# Altium PCB PCB1.pcbdoc (part 2 of 2)
Units mil, origin at the board's own origin, x right, y up, seen from the top; angles counter-clockwise.
Board outline 2165.35 x 3346.46 mil, 4 copper layers (Top Layer, Inner1, Inner2, Bottom Layer), stack 62.447 mil thick; 78 components, 74 nets, 396 pads, 501 vias.
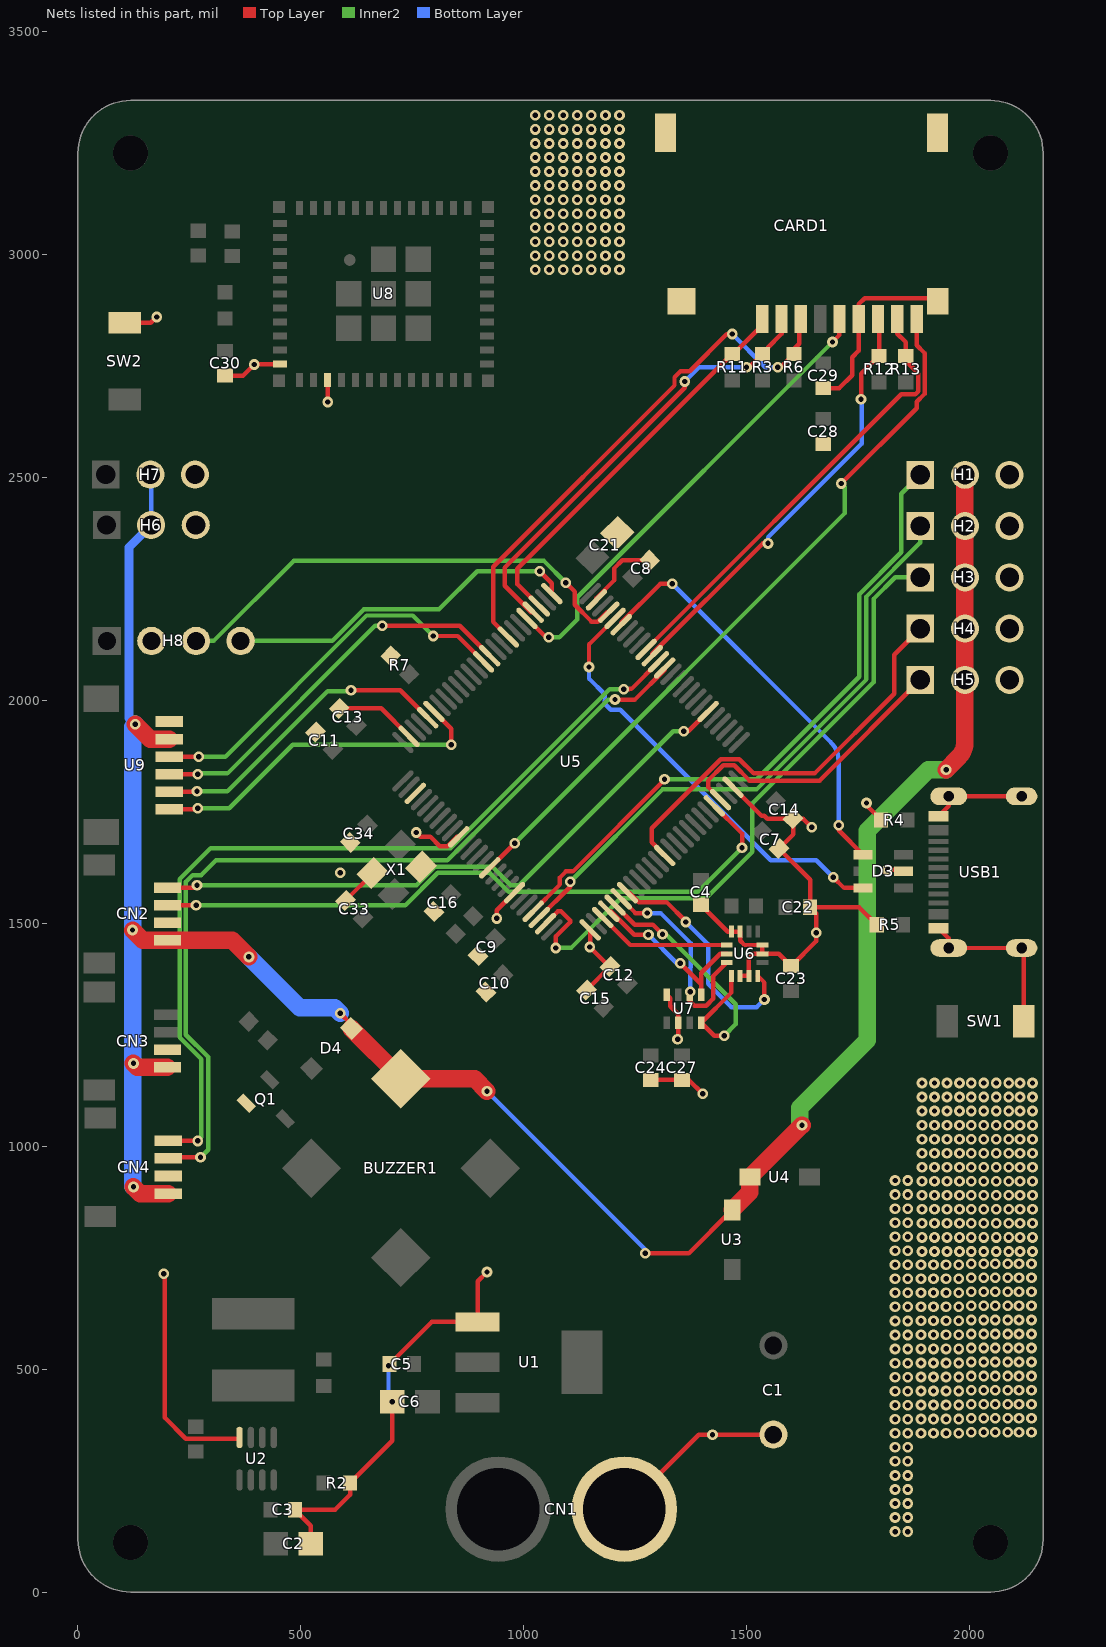
[diagram p4: the nets of this part, all layers, seen from the top]

## Via types
v1: diameter 24.02, hole 12, Top Layer to Bottom Layer, 501 vias

## Nets (pads, with @x,y where several pads share a name; then routed paths per layer and width w, separated by ;. In a path a pad name is that pad's centre, name@x,y a point inside that pad or via, vN(x,y) a via of type N, cw(c..) or ccw(c..) an arc to the next point about the centre after c; other vN are vias at no path point) (continued)
GND: C1.2 C2.1 C3.1 C4.1 C5.2 C6.1 C7.1 C8.1 C9.1 C10.2 C11.2 C12.1 C13.1 C14.2 C15.1 C16.1 C21.1 C22.1 C23.1 C24.1 C27.1 C28.1 C29.1 C30.2 C33.1 C34.2 CARD1.6 CARD1.10 CARD1.11 CARD1.12 CARD1.13 CN1.2 CN2.3 CN3.3 CN4.3 D3.2 H1.3 H2.3 H3.3 H4.3 H5.3 H6.3 H7.3 H8.2 Q1.2 R2.2 R4.1 R5.1 R7.2 SW1.2 SW2.1 U1.1 U2.4 U5.10 U5.19 U5.26 U5.49 U5.74 U5.99 U6.2 U6.3 U6.6 U6.7 U6.10 U6.11 U7.1 U7.7 U8.11 U8.14 U9.1 USB1.1 USB1.2 USB1.3 USB1.4 USB1.A1B12 USB1.B1A12 X1.2 X1.4 | length 5429.1
  Top Layer w10: SW2.1@105,2847.48 163.62,2847.48 v1(176.69,2860.55) ; v1(192.76,714.13) 194.76,712.13 194.76,391.38 242.01,344.13 359.74,344.13 U2.4@362.42,346.81 ; C30.2@330,2728.9 370.31,2728.9 v1(395.55,2754.13) 452.27,2754.13 U8.11@453.25,2755.11 ; C2.1@522.5,108.38 522.5,148.78 C3.1@486.6,184.68 576.89,184.68 610.39,218.19 610.39,243.83 R2.2@609.94,244.29 705.19,339.54 v1(705.19,427.01) ; U8.14@559.55,2719.68 560.2,2719.03 v1(560.2,2669.8) ; C13.1@586.26,1982.59 680.11,1982.59 U5.99@742.85,1919.85 ; C33.1@600.4,1551.26 661.06,1611.92 X1.2@661.06,1613.2 ; v1(696.73,507.32) 696.73,509.14 C5.2@698.93,511.34 793.49,605.9 U1.1@896.68,605.9 896.68,697.23 v1(917.6,718.15) ; v1(758.98,1703.92) 767.95,1694.94 790.14,1694.94 811.78,1673.3 829.19,1673.3 850.26,1694.37 U5.10@854.2,1694.37 ; v1(939.68,1511.26) 939.68,1529.3 U5.19@979.48,1569.09 ; C15.1@1140.73,1350.34 C12.1@1193.76,1403.37 1192.14,1403.37 v1(1148.5,1447.01) 1149.29,1447.8 U5.26@1149.29,1485.58 ; U5.74@1163.21,2226.09 1163.21,2230.03 1202.72,2269.54 1202.72,2296.34 1221.31,2314.93 C8.1@1282.84,2314.93 ; CN1.2@1225.98,186.06 1393.03,353.11 C1.2@1560.12,353.11 ; C24.1@1285,1148.9 C27.1@1355,1148.9 1370.32,1148.9 v1(1401.5,1117.72) ; U7.1@1321.11,1340.33 1328.83,1332.61 1328.83,1313.91 1346.71,1296.03 U7.7@1346.71,1277.33 1346.71,1241.63 v1(1345.28,1240.2) ; C4.1@1397.48,1541.93 1457.82,1481.59 U6.11@1466.04,1481.59 U6.10@1485.73,1481.59 1485.73,1461.16 1495.3,1451.59 U6.7@1535.43,1451.59 U6.6@1535.43,1431.9 ; U5.49@1469.44,1805.73 1533.7,1741.47 1539.72,1741.47 1546.17,1735.02 C14.2@1604.58,1735.02 ; U6.2@1485.73,1382.22 U6.3@1505.41,1382.22 1505.41,1422.42 1514.89,1431.9 U6.6@1535.43,1431.9 ; v1(1646.05,1715.81) 1626.84,1735.02 C14.2@1604.58,1735.02 ; C29.1@1672.24,2701.09 1707.86,2701.09 1736.81,2730.04 1736.81,2770.2 1751.87,2785.25 1751.87,2856.27 CARD1.6@1751.76,2856.38 1751.76,2889.55 1764.92,2902.72 1921.93,2902.72 CARD1.10@1928.9,2895.75 ; v1(1768.94,1770.28) 1768.94,1764.97 R4.1@1801.91,1731.99 ; R5.1@1791.91,1496.99 1752.45,1536.46 C22.1@1642.56,1536.46 ; v1(1816.41,1620.08) 1848.72,1620.08 D3.2@1851.81,1616.99 ; USB1.A1B12@1930.95,1489.02 1953.59,1466.38 USB1.1@1953.59,1444.93 USB1.3@2116.97,1444.93 2122,1439.9 SW1.2@2122,1280.35 ; USB1.B1A12@1930.95,1740.99 1953.59,1763.63 USB1.2@1953.59,1785.09 USB1.4@2116.97,1785.09 ; U6.6@1535.43,1431.9 1572.12,1431.9 C23.1@1600,1404.02 1656.5,1460.51 v1(1656.5,1479.13) 1656.5,1522.52 C22.1@1642.56,1536.46 ; C14.2@1604.58,1735.02 1604.58,1699.67 C7.1@1572.76,1667.85 1642.56,1598.04 C22.1@1642.56,1536.46
  Bottom Layer w10: v1(696.73,507.32) 696.73,435.46 v1(705.19,427.01)
  other v1: 1833.19,135.63 1861.3,135.63 1833.19,167.13 1861.3,167.13 1833.19,198.62 1861.3,198.62 1833.19,230.12 1861.3,230.12 1833.19,261.61 1861.3,261.61 1833.19,293.11 1861.3,293.11 1833.19,324.61 1861.3,324.61 1423.58,352.72 1833.19,356.1 1861.3,356.1 1891.42,356.5 1919.53,356.5 1947.64,356.5 1975.75,356.5 2003.86,358.5 2031.97,358.5 2058.07,358.5 2086.18,358.5 2111.28,358.5 2139.39,358.5 1833.19,387.6 1861.3,387.6 1891.42,387.99 1919.53,387.99 1947.64,387.99 1975.75,387.99 2003.86,390 2031.97,390 2058.07,390 2086.18,390 2111.28,390 2139.39,390 1833.19,419.09 1861.3,419.09 1891.42,419.49 1919.53,419.49 1947.64,419.49 1975.75,419.49 2003.86,421.5 2031.97,421.5 2058.07,421.5 2086.18,421.5 2111.28,421.5 2139.39,421.5 1833.19,450.59 1861.3,450.59 1891.42,450.98 1919.53,450.98 1947.64,450.98 1975.75,450.98 2003.86,452.99 2031.97,452.99 2058.07,452.99 2086.18,452.99 2111.28,452.99 2139.39,452.99 1833.19,482.09 1861.3,482.09 1891.42,482.48 1919.53,482.48 1947.64,482.48 1975.75,482.48 2003.86,484.49 2031.97,484.49 2058.07,484.49 2086.18,484.49 2111.28,484.49 2139.39,484.49 1833.19,513.58 1861.3,513.58 1891.42,513.98 1919.53,513.98 1947.64,513.98 1975.75,513.98 2003.86,515.98 2031.97,515.98 2058.07,515.98 2086.18,515.98 2111.28,515.98 2139.39,515.98 1833.19,545.24 1861.3,545.24 1891.42,545.47 1919.53,545.47 1947.64,545.47 1975.75,545.47 2003.86,547.48 2031.97,547.48 2058.07,547.48 2086.18,547.48 2111.28,547.48 2139.39,547.48 1833.19,576.73 1861.3,576.73 1891.42,576.97 1919.53,576.97 1947.64,576.97 1975.75,576.97 2003.86,578.98 2031.97,578.98 2058.07,578.98 2086.18,578.98 2111.28,578.98 2139.39,578.98 1833.19,608.23 1861.3,608.23 1891.42,608.46 1919.53,608.46 1947.64,608.46 1975.75,608.46 2003.86,610.47 2031.97,610.47 2058.07,610.47 2086.18,610.47 2111.28,610.47 2139.39,610.47 1833.19,639.72 1861.3,639.72 1891.42,639.96 1919.53,639.96 1947.64,639.96 1975.75,639.96 2003.86,641.97 2031.97,641.97 2058.07,641.97 2086.18,641.97 2111.28,641.97 2139.39,641.97 1833.19,671.22 1861.3,671.22 1891.42,671.46 1919.53,671.46 1947.64,671.46 1975.75,671.46 2003.86,673.46 2031.97,673.46 2058.07,673.46 2086.18,673.46 2111.28,673.46 2139.39,673.46 1833.19,702.72 1861.3,702.72 1891.42,702.95 1919.53,702.95 1947.64,702.95 1975.75,702.95 2003.86,704.96 2031.97,704.96 2058.07,704.96 2086.18,704.96 2111.28,704.96 2139.39,704.96 1833.19,734.21 1861.3,734.21 1891.42,734.45 1919.53,734.45 1947.64,734.45 1975.75,734.45 2003.86,736.46 2031.97,736.46 2058.07,736.46 2086.18,736.46 2111.28,736.46 2139.39,736.46 1893.43,764.09 1921.54,764.09 1949.65,764.09 1977.76,764.09 2003.86,764.09 2031.97,764.09 2060.08,764.09 2088.19,764.09 2113.29,764.09 2141.4,764.09 1833.19,765.71 1861.3,765.71 1893.43,795.59 1921.54,795.59 1949.65,795.59 1977.76,795.59 2003.86,795.59 2031.97,795.59 2060.08,795.59 2088.19,795.59 2113.29,795.59 2141.4,795.59 1833.19,797.2 1861.3,797.2 1893.43,827.09 1921.54,827.09 1949.65,827.09 1977.76,827.09 2003.86,827.09 2031.97,827.09 2060.08,827.09 2088.19,827.09 2113.29,827.09 2141.4,827.09 1833.19,828.7 1861.3,828.7 1893.43,858.58 1921.54,858.58 1949.65,858.58 1977.76,858.58 2003.86,858.58 2031.97,858.58 2060.08,858.58 2088.19,858.58 2113.29,858.58 2141.4,858.58 1833.19,860.2 1861.3,860.2 1893.43,890.08 1921.54,890.08 1949.65,890.08 1977.76,890.08 2003.86,890.08 2031.97,890.08 2060.08,890.08 2088.19,890.08 2113.29,890.08 2141.4,890.08 1833.19,891.69 1861.3,891.69 1893.43,921.57 1921.54,921.57 1949.65,921.57 1977.76,921.57 2003.86,921.57 2031.97,921.57 2060.08,921.57 2088.19,921.57 2113.29,921.57 2141.4,921.57 1833.19,923.19 1861.3,923.19 1893.43,953.07 1921.54,953.07 1949.65,953.07 1977.76,953.07 2003.86,953.07 2031.97,953.07 2060.08,953.07 2088.19,953.07 2113.29,953.07 2141.4,953.07 1893.43,984.57 1921.54,984.57 1949.65,984.57 1977.76,984.57 2003.86,984.57 2031.97,984.57 2060.08,984.57 2088.19,984.57 2113.29,984.57 2141.4,984.57 1893.43,1016.06 1921.54,1016.06 1949.65,1016.06 1977.76,1016.06 2003.86,1016.06 2031.97,1016.06 2060.08,1016.06 2088.19,1016.06 2113.29,1016.06 2141.4,1016.06 1893.43,1047.56 1921.54,1047.56 1949.65,1047.56 1977.76,1047.56 2003.86,1047.56 2031.97,1047.56 2060.08,1047.56 2088.19,1047.56 2113.29,1047.56 2141.4,1047.56 1893.43,1079.06 1921.54,1079.06 1949.65,1079.06 1977.76,1079.06 2003.86,1079.06 2031.97,1079.06 2060.08,1079.06 2088.19,1079.06 2113.29,1079.06 2141.4,1079.06 1893.43,1110.55 1921.54,1110.55 1949.65,1110.55 1977.76,1110.55 2003.86,1110.55 2031.97,1110.55 2060.08,1110.55 2088.19,1110.55 2113.29,1110.55 2141.4,1110.55 1893.43,1142.05 1921.54,1142.05 1949.65,1142.05 1977.76,1142.05 2003.86,1142.05 2031.97,1142.05 2060.08,1142.05 2088.19,1142.05 2113.29,1142.05 2141.4,1142.05 588.31,1613.66 1025.91,2966.42 1057.4,2966.42 1088.9,2966.42 1120.39,2966.42 1151.89,2966.42 1183.39,2966.42 1214.88,2966.42 1025.91,2997.91 1057.4,2997.91 1088.9,2997.91 1120.39,2997.91 1151.89,2997.91 1183.39,2997.91 1214.88,2997.91 1025.91,3029.41 1057.4,3029.41 1088.9,3029.41 1120.39,3029.41 1151.89,3029.41 1183.39,3029.41 1214.88,3029.41 1025.91,3060.91 1057.4,3060.91 1088.9,3060.91 1120.39,3060.91 1151.89,3060.91 1183.39,3060.91 1214.88,3060.91 1025.91,3092.4 1057.4,3092.4 1088.9,3092.4 1120.39,3092.4 1151.89,3092.4 1183.39,3092.4 1214.88,3092.4 1025.91,3123.9 1057.4,3123.9 1088.9,3123.9 1120.39,3123.9 1151.89,3123.9 1183.39,3123.9 1214.88,3123.9 1025.91,3155.39 1057.4,3155.39 1088.9,3155.39 1120.39,3155.39 1151.89,3155.39 1183.39,3155.39 1214.88,3155.39 1025.91,3186.89 1057.4,3186.89 1088.9,3186.89 1120.39,3186.89 1151.89,3186.89 1183.39,3186.89 1214.88,3186.89 1025.91,3218.39 1057.4,3218.39 1088.9,3218.39 1120.39,3218.39 1151.89,3218.39 1183.39,3218.39 1214.88,3218.39 1025.91,3249.88 1057.4,3249.88 1088.9,3249.88 1120.39,3249.88 1151.89,3249.88 1183.39,3249.88 1214.88,3249.88 1025.91,3281.38 1057.4,3281.38 1088.9,3281.38 1120.39,3281.38 1151.89,3281.38 1183.39,3281.38 1214.88,3281.38 1025.91,3312.87 1057.4,3312.87 1088.9,3312.87 1120.39,3312.87 1151.89,3312.87 1183.39,3312.87 1214.88,3312.87
i2c_scl: U5.95 U9.6 | length 783.2
  Top Layer w10: U9.6@204.78,1756.17 267,1756.17 v1(269.06,1758.23) ; U5.95@798.53,1975.53 837.28,1936.77 v1(837.28,1900.79)
  Inner2 w10: v1(269.06,1758.23) 339.33,1758.23 481.89,1900.79 v1(837.28,1900.79)
I2C_SCL: 
i2c_sda: U5.96 U9.5 | length 699.7
  Top Layer w10: U9.5@204.78,1795.54 266.21,1795.54 v1(267.05,1796.38) ; v1(612.4,2023.27) 722.96,2023.27 U5.96@784.61,1961.61
  Inner2 w10: v1(267.05,1796.38) 335.32,1796.38 560.2,2021.26 610.39,2021.26 v1(612.4,2023.27)
I2C_SDA: 
IMU_CS: U5.28 U6.12 | length 304.2
  Top Layer w10: U5.28@1177.13,1513.42 1238.96,1451.59 U6.12@1455.71,1451.59
IMU_INT: U5.32 U6.4 | length 532.4
  Top Layer w10: U5.32@1232.81,1569.09 1236.76,1569.09 1257.82,1548.02 1320.56,1548.02 1363.35,1505.24 v1(1363.35,1503.23) ; U6.4@1525.1,1382.22 1540.04,1367.28 v1(1540.04,1329.45)
  Bottom Layer w10: v1(1363.35,1503.23) 1413.54,1453.03 1413.54,1364.69 1465.75,1312.48 1523.07,1312.48 v1(1540.04,1329.45)
LED: U5.3
PA11: D3.4 U5.70 | length 937.3
  Top Layer w10: U5.70@1218.89,2170.41 1218.89,2174.36 1306.74,2262.2 v1(1333.23,2262.2) ; v1(1706.69,1720.08) 1706.69,1709.03 D3.4@1761.33,1654.39
  Bottom Layer w10: v1(1333.23,2262.2) 1689.4,1906.04 cw(c1647.64,1864.28) 1706.69,1864.28 v1(1706.69,1720.08)
PA12: D3.6 U5.71 | length 981
  Top Layer w10: v1(1146.5,2075.47) 1146.5,2125.85 U5.71@1204.97,2184.33 ; v1(1694.68,1603.65) 1718.74,1579.59 D3.6@1761.33,1579.59
  Bottom Layer w10: v1(1146.5,2075.47) 1146.5,2049.37 1181.93,2013.94 1181.93,1992.76 1195.4,1979.29 1216.57,1979.29 1554.09,1641.77 1656.56,1641.77 v1(1694.68,1603.65)
PC0: CARD1.9 U5.15 | length 1649.3
  Top Layer w10: U5.15@923.8,1624.77 924.69,1624.77 v1(979.84,1679.92) ; v1(1712.72,2487.09) 1881.65,2656.02 1881.65,2670.15 1899.25,2687.76 1899.25,2779.72 1881.65,2797.32 CARD1.9@1881.65,2856.38
  Inner2 w10: v1(979.84,1679.92) 1719.79,2419.87 1719.79,2480.02 v1(1712.72,2487.09)
PC8: CARD1.7 R12.2 U5.65 | length 975
  Top Layer w10: U5.65@1288.49,2100.81 1288.49,2104.77 1536.28,2352.56 v1(1548.07,2352.56) ; v1(1756.89,2675.83) 1756.89,2732.95 R12.2@1797.24,2773.31 1797.24,2854.17 CARD1.7@1795.04,2856.38
  Bottom Layer w10: v1(1548.07,2352.56) 1548.07,2366.61 1757.94,2576.48 1757.94,2674.78 v1(1756.89,2675.83)
PC9: CARD1.8 R13.2 U5.66 | length 1032.7
  Top Layer w10: U5.66@1274.56,2114.73 1846.96,2687.13 1878.8,2687.13 1885.24,2693.56 1885.24,2734.41 1857.24,2762.4 R13.2@1857.24,2773.31 1857.24,2804.37 1838.35,2823.27 CARD1.8@1838.35,2856.38
PC10: CARD1.1 R11.2 U5.78 | length 894.3
  Top Layer w10: U5.78@1035.16,2212.16 985.87,2261.46 985.87,2295.88 R11.2@1467.76,2777.77 1471.31,2777.77 1535.24,2841.69 CARD1.1@1535.24,2856.38
PC11: CARD1.2 R3.2 U5.79 | length 1004.8
  Top Layer w10: U5.79@1021.24,2198.25 1017.28,2198.25 957.76,2257.78 957.76,2298.35 1361.34,2701.93 v1(1361.34,2715.98) ; v1(1499.88,2748.11) 1506.36,2748.11 R3.2@1536.02,2777.77 ; R3.2@1547.24,2778.31 1547.24,2791.46 1578.53,2822.74 CARD1.2@1578.53,2856.38
  Bottom Layer w10: v1(1361.34,2715.98) 1393.46,2748.11 v1(1499.88,2748.11)
PC12: CARD1.5 U5.80 | length 1065.4
  Top Layer w10: U5.80@1007.32,2184.33 1049.91,2141.73 v1(1056.14,2141.73) ; v1(1692.64,2804.33) 1708.44,2820.13 CARD1.5@1708.44,2856.38
  Inner2 w10: v1(1056.14,2141.73) 1080.24,2141.73 1120.39,2181.89 1120.39,2232.09 v1(1692.64,2804.33)
PD2: CARD1.3 R6.2 U5.83 | length 1201.6
  Top Layer w10: U5.83@965.57,2142.57 931.65,2176.48 931.65,2300.35 1338.35,2707.05 1338.35,2725.51 1351.81,2738.98 1372.28,2738.98 1455.71,2822.4 v1(1467.76,2822.4) ; v1(1570.16,2748.11) 1576.64,2748.11 R6.2@1606.3,2777.77 1607.24,2778.72 1607.24,2789.21 1618.35,2800.31 1618.35,2852.91 CARD1.3@1621.82,2856.38
  Bottom Layer w10: v1(1467.76,2822.4) 1542.05,2748.11 v1(1570.16,2748.11)
SERVO1: H1.1 U5.22 | length 1469.5
  Top Layer w10: U5.22@1021.24,1527.33 1081.34,1587.43 1081.34,1603.11 1094.81,1616.57 1110.49,1616.57 1315.97,1822.05 v1(1315.97,1823.68)
  Inner2 w10: v1(1315.97,1823.68) 1523.17,1823.68 1752.87,2053.39 1752.87,2238.11 1847.24,2332.48 1847.24,2463.7 H1.1@1890,2506.46
SERVO2: H2.1 U5.23 | length 1355.6
  Top Layer w10: U5.23@1035.16,1513.42 1104.33,1582.59 v1(1104.33,1593.58)
  Inner2 w10: v1(1104.33,1593.58) 1311.44,1800.69 1522.26,1800.69 1768.94,2047.36 1768.94,2233.42 1890,2354.49 H2.1@1890,2391.46
SERVO3: H3.1 U5.24 | length 1485.7
  Top Layer w10: U5.24@1049.08,1499.49 1076.91,1527.32 1083.66,1527.32 1104.43,1506.55 1104.43,1503.13 1072.2,1470.9 v1(1072.2,1445)
  Inner2 w10: v1(1072.2,1445) 1106.34,1445 1217.91,1556.57 1409.05,1556.57 1512.83,1660.36 1512.83,1769.17 1785,2041.34 1785,2228.07 1833.39,2276.46 H3.1@1890,2276.46
SERVO4: H4.1 U5.38 | length 939.5
  Top Layer w10: U5.38@1316.33,1652.61 1287.05,1681.89 1287.05,1713.8 1441.89,1868.64 1483.84,1868.64 1515.94,1836.54 1652.48,1836.54 1831.18,2015.24 1831.18,2102.64 H4.1@1890,2161.46
SERVO5: H5.1 U5.47 | length 652.6
  Top Layer w10: U5.47@1441.6,1777.89 1413.54,1805.95 1413.54,1820.47 1447.7,1854.63 1472.26,1854.63 1506.41,1820.47 1664.02,1820.47 H5.1@1890,2046.46
SPI_MISO: U5.30 U6.1 U7.5 | length 641.1
  Top Layer w10: U5.30@1204.97,1541.25 1249.02,1497.2 1269.94,1497.2 1270.31,1497.57 1289.35,1497.57 v1(1311.47,1475.45) ; v1(1449.69,1248.23) 1427.41,1248.23 U7.5@1398.31,1277.33 1466.04,1345.06 U6.1@1466.04,1382.22
  Inner2 w10: v1(1311.47,1475.45) 1319.23,1475.45 1475.79,1318.89 1475.79,1274.33 v1(1449.69,1248.23)
SPI_MOSI: U5.31 U6.14 U7.3 | length 478.2
  Top Layer w10: U5.31@1218.89,1555.17 1250.75,1523.31 v1(1277.01,1523.31) ; U7.3@1372.71,1340.33 1372.71,1325.2 1382.35,1315.56 1409.76,1315.56 1425.59,1331.4 1425.59,1382.09 U6.14@1455.71,1412.22
  Bottom Layer w10: v1(1277.01,1523.31) 1307.13,1523.31 1374.29,1456.14 1374.29,1401.34 1373.39,1400.44 v1(1373.39,1346.61)
SPI_SCK: U5.29 U6.13 U7.4 | length 398.9
  Top Layer w10: U5.29@1191.05,1527.33 1195.01,1527.33 1247.76,1474.58 v1(1279.83,1474.58) ; v1(1351.3,1410.87) 1398.31,1363.86 ; U7.4@1398.31,1340.33 1398.31,1363.86 ; U6.13@1455.71,1431.9 1441.06,1431.9 1398.31,1389.15 1398.31,1363.86
  Bottom Layer w10: v1(1279.83,1474.58) 1343.54,1410.87 v1(1351.3,1410.87)
SWCLK: H8.4 U5.76 | length 797.6
  Top Layer w10: v1(1036.06,2290.31) 1063,2263.38 U5.76@1063,2240
  Inner2 w10: H8.4@364.84,2133.7 570.49,2133.7 641.64,2204.84 810.04,2204.84 895.51,2290.31 v1(1036.06,2290.31)
SWDIO: H8.3 U5.72 | length 1083.1
  Top Layer w10: v1(1094.68,2264.21) 1114.31,2244.59 1114.31,2214.91 1152.04,2177.18 1166.03,2177.18 1187.1,2198.25 U5.72@1191.05,2198.25
  Inner2 w10: H8.3@264.84,2133.7 304.21,2133.7 483.82,2313.31 1045.59,2313.31 v1(1094.68,2264.21)
usart2rx: U5.87 U9.3 | length 715.7
  Top Layer w10: U9.3@204.78,1874.28 v1(271.06,1874.28) ; v1(797.13,2144.84) 851.94,2144.84 U5.87@909.89,2086.89
  Inner2 w10: 330.9,1874.28 647.44,2190.83 ; 751.14,2190.83 v1(797.13,2144.84)
USART2RX:  | length 163.5
  Inner2 w10: 271.06,1874.28 330.9,1874.28 ; 647.44,2190.83 751.14,2190.83
usart2tx: U5.86 U9.4 | length 884.7
  Top Layer w10: U9.4@204.78,1834.91 v1(269.06,1834.91) ; v1(682.68,2167.83) 856.78,2167.83 U5.86@923.8,2100.81
  Inner2 w10: v1(269.06,1834.91) 270.68,1836.54 335.32,1836.54 666.61,2167.83 v1(682.68,2167.83)
USART2TX: 
usart3rx: CN2.1 U5.56 | length 915.8
  Top Layer w10: CN2.1@200.79,1580.35 v1@261.85,1580.35 ; v1(1359.33,1930.91) 1369.14,1930.91 U5.56@1413.77,1975.53
  Inner2 w10: v1(267.05,1585.55) 759.49,1585.55 801.58,1627.64 929.21,1627.64 971.3,1585.55 989.88,1585.55 ; 1335.24,1930.91 v1(1359.33,1930.91)
USART3RX:  | length 495.8
  Top Layer w10: 261.85,1580.35 267.05,1585.55
  Inner2 w10: 989.88,1585.55 1335.24,1930.91
usart3tx: CN2.2 U5.46 | length 1466
  Top Layer w10: CN2.2@200.79,1540.98 v1(265.04,1540.98) ; U5.46@1427.68,1763.96 1489.84,1701.8
  Inner2 w10: v1(265.04,1540.98) 734.74,1540.98 807.38,1613.62 923.4,1613.62 966.44,1570.59 1390.55,1570.59 v1(1489.84,1669.88)
USART3TX:  | length 31.9
  Top Layer w10: 1489.84,1669.88 1489.84,1701.8
usart6rx: CN4.1 U5.64 | length 860.8
  Top Layer w10: CN4.1@202.8,1012.12 v1(269.06,1012.12) ; 1241.71,2026.18 U5.64@1302.41,2086.89
  Inner2 w10: v1(269.06,1012.12) 277.09,1020.15 277.09,1195.49 228.03,1244.55 228.03,1598.87 297.52,1668.36
USART6RX:  | length 1092.4
  Top Layer w10: v1(1224.8,2025.28) 1236.46,2025.28 1237.37,2026.18 1241.71,2026.18
  Inner2 w10: 297.52,1668.36 835.77,1668.36 1192.68,2025.28 v1(1224.8,2025.28)
usart6tx: CN4.2 U5.63 | length 445.9
  Top Layer w10: v1(1204.92,2002.28) 1249.6,2002.28 1316.33,2069.01 U5.63@1316.33,2072.97
  Inner2 w10: 242.05,1250.35 292.05,1200.35 292.05,992.13 v1(275.08,975.16)
USART6TX:  | length 1548.4
  Top Layer w10: 202.8,972.75 205.2,975.16 275.08,975.16
  Inner2 w10: 242.05,1250.35 242.05,1593.07 257.52,1608.54 276.57,1608.54 309.68,1641.65 828.88,1641.65 1189.51,2002.28 1204.92,2002.28
VCC_5V: BUZZER1.1 CN2.4 CN3.4 CN4.4 D4.2 H1.2 H2.2 H3.2 H4.2 H5.2 H6.2 H7.2 U3.1 U4.1 U9.2 | length 5472.9
  Top Layer w10: v1(588.31,1298.43) 613.6,1273.13 D4.2@613.6,1264.33 ; v1(1272.99,760.32) 1370.71,760.32 U3.1@1467.76,857.36
  Top Layer w39.37: v1(122.48,1485.16) 145.41,1462.23 CN2.4@200.77,1462.23 346.2,1462.23 v1(383.5,1424.92) ; v1(124.49,908.9) 139.39,894 CN4.4@202.78,894 ; v1(124.49,1185.98) 133.36,1177.11 CN3.4@200.77,1177.11 ; v1(128.5,1946.97) 161.82,1913.65 U9.2@204.78,1913.65 ; D4.2@613.6,1264.33 724.34,1153.59 BUZZER1.1@724.34,1151.23 890.1,1151.23 v1(917.6,1123.74) ; U3.1@1467.76,857.36 1507.24,896.85 U4.1@1507.24,930.98 1623.7,1047.44 v1(1624.37,1047.44) ; v1(1947.64,1844.57) 1975.31,1872.24 ccw(c1939.85,1907.7) 1990,1907.7 H5.2@1990,2046.46 H4.2@1990,2161.46 H3.2@1990,2276.46 H2.2@1990,2391.46 H1.2@1990,2506.46
  Inner2 w39.37: v1@1619.31,1046.39 1619.31,1086.55 1770.94,1238.19 1770.94,1707.63 1907.89,1844.57 v1(1947.64,1844.57)
  Bottom Layer w10: v1@122.54,1187.93 v1(124.49,1185.98) ; H7.2@162.44,2507.02 164.25,2505.21 H6.2@164.25,2393.78 ; v1(917.6,1123.74) 1272.99,768.35 v1(1272.99,760.32)
  Bottom Layer w19.68: v1(128.5,1946.97) 114.45,1961.02 114.45,2343.98 H6.2@164.25,2393.78
  Bottom Layer w39.37: v1(124.49,908.9) 122.48,910.91 122.48,1187.93 v1(122.48,1485.16) 122.48,1940.94 v1(128.5,1946.97) ; v1(383.5,1424.92) 497.95,1310.47 576.26,1310.47 v1(588.31,1298.43)
pads on no net: BUZZER1.3 BUZZER1.4 CN2.5 CN2.6 CN3.5 CN3.6 CN4.5 CN4.6 SCREW?.1 U2.1 U2.7 U5.1 U5.4 U5.7 U5.8 U5.9 U5.17 U5.18 U5.33 U5.36 U5.37 U5.39 U5.40 U5.41 U5.42 U5.43 U5.44 U5.45 U5.51 U5.52 U5.53 U5.54 U5.55 U5.57 U5.58 U5.59 U5.60 U5.61 U5.62 U5.67 U5.77 U5.81 U5.82 U5.84 U5.85 U5.88 U5.89 U5.90 U5.91 U5.92 U5.93 U5.97 U5.98 U6.9 U8.4 U8.5 U8.6 U8.7 U8.9 U8.10 U8.13 U8.15 U8.16 U8.17 U8.18 U8.19 U8.20 U8.21 U8.22 U8.23 U8.24 U8.25 U8.26 U8.27 U8.28 U8.29 U8.32 U8.33 U8.34 U8.35 U9.7 U9.8 USB1.A8 USB1.B8

## Polygon pours and split planes (outlines as drawn)
GND on Inner1 (solid, remove dead copper): -86.34,3111.54 -86.34,-58.9 2206.65,-58.9 2206.65,3111.54
3.3V on Inner2 (solid, remove dead copper): -144.57,3107.52 -144.57,-163.31 2299.02,-163.31 2299.02,3107.52
B+ on Top Layer (solid, remove dead copper, pour order 0): -114.45,637.83 -114.45,-34.8 1638.43,-34.8 1638.43,637.83
GND on Top Layer (solid, remove dead copper, pour order 2): -152.6,1428.94 2283.58,1428.94 2313.07,11.38 2260.87,-40.83 1690.63,-40.83 1688.62,-38.82 1688.34,675.98 -56.22,675.98 -124.49,744.25
GND on Top Layer (solid, remove dead copper, pour order 4): -188.74,3452.87 347.36,3452.87 373.75,3426.48 372.88,3129.28 390.62,3111.54 977.83,3111.54 997.91,3131.61 997.91,3356.5 1011.97,3370.55 2232.76,3370.55 2276.93,3326.38 2276.93,1406.85 2273.99,1403.92 -171.98,1403.92 -188.74,1420.68

## Keep-outs
Board Outline Layer:
  the board outline again, w10

## Other copper
Top Layer:
  drawing of 396 lines, arcs and shapes, not listed
Inner2:
  region net SERVO1: 1859.21,2468.6 1852.64,2476.16 1854.87,2479.28 1856.65,2482.67 1857.95,2486.27 1858.74,2490.02 1859,2493.84 1876.89,2474.96 1873.07,2474.7 1869.32,2473.91 1865.72,2472.61 1862.32,2470.83
  region net SERVO2: 1895,2354.49 1885,2354.49 1883.72,2356.71 1881.85,2358.46 1879.54,2359.58 1877,2359.96 1903,2359.96 1900.46,2359.58 1898.15,2358.46 1896.28,2356.71
  region net SERVO3: 1842,2271.46 1842,2281.46 1845.86,2281.8 1849.6,2282.81 1853.11,2284.46 1856.28,2286.7 1859,2289.46 1859,2263.46 1856.28,2266.22 1853.11,2268.45 1849.6,2270.1 1845.86,2271.12
  region net SWCLK: 408.26,2138.7 408.26,2128.7 406.09,2127.08 400.95,2122.79 385.94,2109.78 385.94,2157.62 400.95,2144.61 406.09,2140.33
  region net SWDIO: 304.21,2138.7 304.21,2128.7 302.84,2128.53 301.49,2128.03 300.15,2127.25 298.83,2126.23 296.26,2123.63 293.81,2120.55 289.43,2114.21 287.55,2111.6 285.94,2109.78 285.94,2157.62 287.55,2155.81 289.43,2153.19 293.81,2146.85 296.26,2143.77 298.83,2141.17 300.15,2140.15 301.49,2139.37 302.84,2138.88
  region net SERVO3: 1088.55,1450 1088.55,1440 1086.74,1439.66 1084.48,1438.75 1082.15,1437.47 1080.15,1435.99 1080.15,1454.01 1082.15,1452.53 1084.48,1451.25 1086.74,1450.34
  region net SERVO2: 1112.35,1608.68 1119.43,1601.61 1118.39,1600.08 1117.43,1597.84 1116.69,1595.28 1116.31,1592.83 1103.58,1605.57 1106.03,1605.94 1108.59,1606.68 1110.83,1607.64
  region net SERVO1: 1332.31,1828.68 1332.31,1818.68 1330.51,1818.33 1328.24,1817.43 1325.91,1816.14 1323.91,1814.67 1323.91,1832.69 1325.91,1831.21 1328.24,1829.93 1330.51,1829.02
  region net USART6TX: 283.1,990.25 290.17,983.18 289.14,981.66 288.18,979.41 287.44,976.86 287.06,974.41 274.33,987.14 276.78,987.52 279.34,988.26 281.58,989.22
  region net USART6RX: 1208.46,2020.28 1208.46,2030.28 1210.26,2030.62 1212.53,2031.53 1214.86,2032.81 1216.86,2034.28 1216.86,2016.27 1214.86,2017.74 1212.53,2019.02 1210.26,2019.93
  region net ADC1_INP11: 285.4,1260.86 285.4,1250.86 283.59,1250.52 281.33,1249.61 279,1248.33 277,1246.86 277,1264.87 279,1263.4 281.33,1262.11 283.59,1261.21
  region net ADC1_INP11: 871.13,1552.44 871.13,1562.44 872.94,1562.79 875.21,1563.69 877.54,1564.98 879.54,1566.45 879.54,1548.44 877.54,1549.91 875.21,1551.19 872.94,1552.1
  region net ADC1_INP15: 281.39,1300.23 281.39,1290.23 279.58,1289.89 277.31,1288.98 274.98,1287.7 272.98,1286.23 272.98,1304.24 274.98,1302.77 277.31,1301.48 279.58,1300.58
  region net ADC1_INP15: 1016.95,1461.06 1024.02,1468.13 1025.55,1467.09 1027.79,1466.13 1030.34,1465.39 1032.8,1465.02 1020.06,1452.28 1019.69,1454.73 1018.95,1457.29 1017.99,1459.53
  region net USART3TX: 281.39,1545.98 281.39,1535.98 279.58,1535.63 277.31,1534.73 274.98,1533.44 272.98,1531.97 272.98,1549.99 274.98,1548.51 277.31,1547.23 279.58,1546.32
  region net USART3TX: 1481.82,1654.79 1474.75,1661.86 1475.78,1663.38 1476.74,1665.62 1477.48,1668.18 1477.86,1670.63 1490.59,1657.9 1488.14,1657.52 1485.59,1656.78 1483.34,1655.82
  region net USART3RX: 283.4,1590.55 283.4,1580.55 281.59,1580.21 279.32,1579.3 276.99,1578.02 274.99,1576.55 274.99,1594.56 276.99,1593.09 279.32,1591.8 281.59,1590.9
  region net USART3RX: 1342.98,1925.91 1342.98,1935.91 1344.79,1936.25 1347.06,1937.16 1349.39,1938.44 1351.39,1939.91 1351.39,1921.9 1349.39,1923.37 1347.06,1924.65 1344.79,1925.56
  region net I2C_SDA: 283.4,1801.38 283.4,1791.38 281.59,1791.03 279.32,1790.13 276.99,1788.84 274.99,1787.37 274.99,1805.38 276.99,1803.91 279.32,1802.63 281.59,1801.72
  region net I2C_SDA: 597.67,2016.26 594.66,2026.26 595.62,2026.36 596.71,2026.65 599.06,2027.68 601.31,2029.14 603.07,2030.82 606.08,2013.06 603.9,2014.24 601.51,2015.26 599.31,2015.98
  region net USART2TX: 284.11,1841.54 286.55,1831.54 285.61,1831.43 284.55,1831.15 282.22,1830.14 279.95,1828.71 278.14,1827.06 275.71,1844.91 277.86,1843.67 280.24,1842.59 282.45,1841.83
  region net USART2TX: 666.61,2162.83 666.61,2172.83 668.32,2173.18 670.49,2174.09 672.76,2175.37 674.73,2176.84 674.73,2158.83 672.76,2160.3 670.49,2161.58 668.32,2162.49
  region net I2C_SCL: 285.4,1763.23 285.4,1753.23 283.59,1752.88 281.33,1751.98 279,1750.69 277,1749.22 277,1767.23 279,1765.76 281.33,1764.48 283.59,1763.57
  region net I2C_SCL: 820.94,1895.79 820.94,1905.79 822.74,1906.13 825.01,1907.04 827.34,1908.32 829.34,1909.79 829.34,1891.78 827.34,1893.25 825.01,1894.54 822.74,1895.44
  region net USART2RX: 287.41,1879.28 287.41,1869.28 285.6,1868.94 283.34,1868.03 281.01,1866.75 279.01,1865.28 279.01,1883.29 281.01,1881.82 283.34,1880.54 285.6,1879.63
  region net USART2RX: 782.03,2152.87 789.1,2159.94 790.62,2158.9 792.87,2157.94 795.42,2157.2 797.88,2156.83 785.14,2144.09 784.77,2146.54 784.03,2149.1 783.07,2151.34
  region net SWCLK: 1019.72,2285.31 1019.72,2295.31 1021.52,2295.66 1023.79,2296.57 1026.12,2297.85 1028.12,2299.32 1028.12,2281.31 1026.12,2282.78 1023.79,2284.06 1021.52,2284.97
  region net SWDIO: 1079.59,2272.24 1086.66,2279.31 1088.18,2278.27 1090.42,2277.31 1092.98,2276.57 1095.43,2276.2 1082.7,2263.46 1082.32,2265.91 1081.58,2268.47 1080.62,2270.71
  region net PC0: 1724.79,2477.57 1714.79,2466.84 1714.7,2468.3 1714.44,2469.73 1714.04,2471.11 1713.52,2472.36 1712.9,2473.45 1712.22,2474.33 1711.48,2474.94 1710.72,2475.25 1724.67,2485.97 1724.67,2482.4
  region net PC0: 987.87,1695.02 994.94,1687.95 993.9,1686.42 992.94,1684.18 992.2,1681.62 991.83,1679.17 979.09,1691.91 981.54,1692.28 984.1,1693.02 986.34,1693.98
  region net PC12: 1684.61,2789.24 1677.54,2796.31 1678.58,2797.83 1679.54,2800.07 1680.28,2802.63 1680.65,2805.08 1693.39,2792.35 1690.94,2791.97 1688.38,2791.23 1686.14,2790.27
  region net PC12: 1072.49,2146.73 1072.49,2136.73 1070.68,2136.39 1068.41,2135.48 1066.08,2134.2 1064.08,2132.73 1064.08,2150.74 1066.08,2149.27 1068.41,2147.98 1070.68,2147.08
  region net SPI_MISO: 1326.92,1474.83 1325.67,1461.95 1324.7,1462.75 1323.57,1463.45 1322.32,1464.02 1321.01,1464.45 1319.7,1464.72 1318.43,1464.82 1317.28,1464.73 1316.28,1464.45 1321.79,1481.59 1324.3,1477.97
  region net SPI_MISO: 1457.71,1263.32 1464.78,1256.25 1463.74,1254.73 1462.78,1252.49 1462.04,1249.93 1461.67,1247.48 1448.93,1260.21 1451.39,1260.59 1453.94,1261.33 1456.19,1262.29
Bottom Layer:
  region net VCC_5V: 140.89,2356.5 126.97,2370.42 127.85,2371.73 128.75,2373.87 129.65,2376.69 130.5,2380.04 131.28,2383.77 131.95,2387.73 132.47,2391.77 132.82,2395.75 166.22,2362.35 162.24,2362 158.2,2361.48 154.24,2360.81 150.51,2360.03 147.16,2359.17 144.35,2358.28 142.21,2357.38
  region net VCC_5V: 159.25,2436.66 169.25,2436.66 170.85,2434.5 175.07,2429.42 187.87,2414.61 140.63,2414.61 153.43,2429.42 157.65,2434.5
  region net VCC_5V: 169.25,2465.53 159.25,2462.82 158.82,2463.75 157.6,2465.46 153.25,2470.7 147.1,2477.51 140.06,2484.86 187.22,2487.58 185.44,2485.71 182.93,2483.49 179.99,2480.96 176.92,2478.18 174.01,2475.2 171.57,2472.07 170.61,2470.46 169.88,2468.83 169.42,2467.18
  region net PC8: 1762.94,2660.29 1752.94,2658.72 1752.84,2659.62 1752.57,2660.65 1751.59,2662.96 1750.2,2665.25 1748.61,2667.13 1766.55,2668.7 1765.23,2666.6 1764.07,2664.23 1763.25,2662
  region net PC8: 1543.07,2366.61 1553.07,2366.61 1553.42,2365.65 1554.32,2364.12 1555.61,2362.3 1557.08,2360.5 1539.06,2360.5 1540.54,2362.3 1541.82,2364.12 1542.73,2365.65
  region net PC11: 1369.36,2731.08 1376.43,2724.01 1375.4,2722.49 1374.44,2720.24 1373.7,2717.69 1373.32,2715.23 1360.59,2727.97 1363.04,2728.34 1365.6,2729.08 1367.84,2730.04
  region net PC11: 1483.53,2743.11 1483.53,2753.11 1485.34,2753.45 1487.61,2754.36 1489.94,2755.65 1491.94,2757.12 1491.94,2739.1 1489.94,2740.58 1487.61,2741.86 1485.34,2742.77
  region net PD2: 1482.85,2814.38 1475.78,2807.31 1474.26,2808.34 1472.01,2809.3 1469.46,2810.04 1467,2810.42 1479.74,2823.15 1480.11,2820.7 1480.85,2818.14 1481.82,2815.9
  region net PD2: 1553.81,2743.11 1553.81,2753.11 1555.62,2753.45 1557.88,2754.36 1560.22,2755.65 1562.22,2757.12 1562.22,2739.1 1560.22,2740.58 1557.88,2741.86 1555.62,2742.77
  region net ESC1: 415.91,2297.32 415.91,2287.32 414.11,2286.98 411.84,2286.07 409.51,2284.79 407.51,2283.32 407.51,2301.33 409.51,2299.86 411.84,2298.57 414.11,2297.67
  region net VCC_5V: 932.69,1115.72 925.62,1108.64 924.1,1109.68 921.86,1110.64 919.3,1111.38 916.85,1111.76 929.58,1124.49 929.96,1122.04 930.7,1119.48 931.66,1117.24
  region net VCC_5V: 1259.38,774.89 1272.66,775.75 1275.83,773.03 1279.32,770.52 1262.46,766.09 1262.73,766.89 1262.77,767.88 1262.61,769.01 1262.26,770.22 1261.08,772.7 1260.28,773.85
  region net BARO_CS: 1296.05,1412.87 1303.12,1419.94 1304.64,1418.9 1306.88,1417.94 1309.44,1417.2 1311.89,1416.83 1299.16,1404.09 1298.78,1406.54 1298.04,1409.1 1297.08,1411.34
  region net BARO_CS: 805.44,1851.57 805.44,1841.57 803.63,1841.23 801.37,1840.32 799.04,1839.04 797.04,1837.57 797.04,1855.58 799.04,1854.11 801.37,1852.83 803.63,1851.92
  region net IMU_INT: 1378.44,1495.2 1371.37,1488.13 1369.85,1489.17 1367.6,1490.13 1365.05,1490.87 1362.59,1491.24 1375.33,1503.98 1375.7,1501.53 1376.44,1498.97 1377.41,1496.73
  region net IMU_INT: 1532.02,1314.35 1524.94,1321.42 1525.98,1322.95 1526.94,1325.19 1527.68,1327.75 1528.06,1330.2 1540.79,1317.46 1538.34,1317.09 1535.78,1316.35 1533.54,1315.39
  region net ESP_TX: 1006.24,2934.89 999.17,2927.82 997.64,2928.85 995.4,2929.81 992.84,2930.56 990.39,2930.93 1003.13,2943.67 1003.5,2941.21 1004.24,2938.66 1005.2,2936.41
  region net ESP_RX: 1288.01,2195.94 1295.09,2203.01 1296.61,2201.97 1298.85,2201.01 1301.41,2200.27 1303.86,2199.9 1291.13,2187.16 1290.75,2189.62 1290.01,2192.17 1289.05,2194.42
  region net ESP_RX: 1037.1,2846.5 1030.03,2839.43 1028.51,2840.47 1026.27,2841.43 1023.71,2842.17 1021.26,2842.54 1033.99,2855.28 1034.37,2852.83 1035.11,2850.27 1036.07,2848.03
  region net $1N145: 1674.28,1293.43 1674.28,1303.43 1676.09,1303.77 1678.36,1304.68 1680.69,1305.96 1682.69,1307.43 1682.69,1289.42 1680.69,1290.89 1678.36,1292.17 1676.09,1293.08
  region net SPI_SCK: 1335.85,1411.48 1337.11,1424.37 1338.07,1423.56 1339.21,1422.87 1340.46,1422.3 1341.76,1421.87 1343.08,1421.6 1344.34,1421.5 1345.5,1421.58 1346.49,1421.87 1340.98,1404.72 1338.48,1408.35
  region net SPI_SCK: 1294.93,1466.55 1287.86,1459.48 1286.33,1460.52 1284.09,1461.48 1281.53,1462.22 1279.08,1462.59 1291.82,1475.33 1292.19,1472.88 1292.93,1470.32 1293.89,1468.08
  region net +5V: 1840.18,1394.8 1847.25,1401.87 1848.77,1400.83 1851.02,1399.87 1853.57,1399.13 1856.03,1398.76 1843.29,1386.02 1842.92,1388.47 1842.18,1391.03 1841.22,1393.27
  region net PA12: 1679.58,1611.68 1686.65,1618.75 1688.17,1617.71 1690.42,1616.75 1692.97,1616.01 1695.43,1615.64 1682.69,1602.9 1682.32,1605.35 1681.58,1607.91 1680.62,1610.15
  region net PA12: 1151.5,2059.12 1141.5,2059.12 1141.15,2060.93 1140.24,2063.2 1138.96,2065.53 1137.49,2067.53 1155.5,2067.53 1154.03,2065.53 1152.75,2063.2 1151.84,2060.93
  region net VCC_5V: 111.36,1950.2 125.27,1964.12 126.86,1962.66 128.54,1961.33 131.89,1959.03 134.87,1957.11 136.99,1955.46 120.01,1938.48 118.36,1940.61 116.44,1943.58 114.14,1946.94 112.81,1948.61
  region net D-: 1835.19,1566.51 1842.26,1559.44 1841.23,1557.92 1840.26,1555.67 1839.52,1553.12 1839.15,1550.67 1826.41,1563.4 1828.87,1563.78 1831.42,1564.52 1833.67,1565.48
  region net D-: 1856.26,1633.46 1846.26,1633.46 1845.92,1635.26 1845.01,1637.53 1843.72,1639.86 1842.25,1641.86 1860.27,1641.86 1858.79,1639.86 1857.51,1637.53 1856.6,1635.26
  region net SPI_MOSI: 1293.36,1528.31 1293.36,1518.31 1291.55,1517.96 1289.28,1517.06 1286.95,1515.77 1284.95,1514.3 1284.95,1532.31 1286.95,1530.84 1289.28,1529.56 1291.55,1528.65
  region net SPI_MOSI: 1368.39,1362.96 1378.39,1362.96 1378.73,1361.15 1379.64,1358.89 1380.92,1356.56 1382.39,1354.56 1364.38,1354.56 1365.85,1356.56 1367.13,1358.89 1368.04,1361.15
  region net +5V: 1717.72,1625.42 1707.72,1625.42 1707.37,1627.23 1706.46,1629.5 1705.18,1631.83 1703.71,1633.83 1721.72,1633.83 1720.25,1631.83 1718.97,1629.5 1718.06,1627.23
  region net VCC_5V: 107.49,1954.06 121.41,1967.98 126.09,1963.35 130.82,1958.78 104.82,1949.64 105.43,1950.78 106.11,1951.88 106.86,1952.94 107.49,1954.06

## Silkscreen, mask and mechanical layers (free items; w line width, h text height)
Top Silkscreen Layer:
  text "SD-CARD" at 1937.6,3155.71 h39.37 r270
  text "5V" at 1967.21,2567.6 h39.37
  text "GND" at 2050.04,2567.4 h39.37
  text "5V" at 142.56,2561.38 h39.37
  text "GND" at 226.89,2561.38 h39.37
  text "M1" at 39.46,2557.72 h39.37
  text "KVK TVC V1" at 646.54,2525.24 h120
  text "S1" at 1783.11,2482.72 h39.37
  text "Made by salahddine" at 646.54,2471.02 h39.37
  text "S2" at 1785.37,2366.97 h39.37
  text "5V" at 143.69,2298.7 h39.37
  text "GND" at 228.02,2298.7 h39.37
  text "M2" at 38.15,2298.35 h39.37
  text "S3" at 1784.24,2258.19 h39.37
  text "S4" at 1786.51,2142.44 h39.37
  text "5V" at 41.47,2035.67 h39.37
  text "GND" at 114.45,2035.31 h39.37
  text "SWDIO" at 204.8,2035.31 h39.37
  text "CLK" at 341.34,2033.31 h39.37
  text "S5" at 1786.85,2022.72 h39.37
  text "5V" at 304.12,1933.41 h39.37
  text "GND" at 301.18,1898.78 h39.37
  text "RX" at 301.18,1860.63 h39.37
  text "TX" at 301.18,1816.46 h39.37
  text "SDA" at 302.31,1776.65 h39.37
  text "SCL" at 302.31,1736.49 h39.37
  text "RX" at 307.37,1557.65 h39.37
  text "TX" at 307.49,1518.77 h39.37
  text "GND" at 308.01,1484.38 h39.37
  text "5V" at 308.13,1445.5 h39.37
  text "ADC" at 275.08,1272.32 h39.37
  text "ADC" at 277.09,1232.17 h39.37
  text "GND" at 275.08,1196.02 h39.37
  text "5V" at 276.6,1158.8 h39.37
  text "RX" at 288.37,988.93 h39.37
  text "TX" at 288.49,950.05 h39.37
  text "GND" at 289.02,915.65 h39.37
  text "5V" at 289.13,876.77 h39.37
Bottom Silkscreen Layer:
  drawing of 524 lines, arcs and shapes, not listed

## Text inside footprints (layer, text, board x,y; h text height)
BUZZER1: Top Silkscreen Layer "+" at 682.57,1048.24 h80 r315